# Altium PCB Space_Test_Battery.PcbDoc
Units mil, origin at the board's own origin, x right, y up, seen from the top; angles counter-clockwise.
Board outline 3932.01 x 2357.2 mil, 2 copper layers (Top Layer, Bottom Layer); 59 components, 50 nets, 196 pads, 26 vias.
Unrouted connection lines stored in the file: 5.
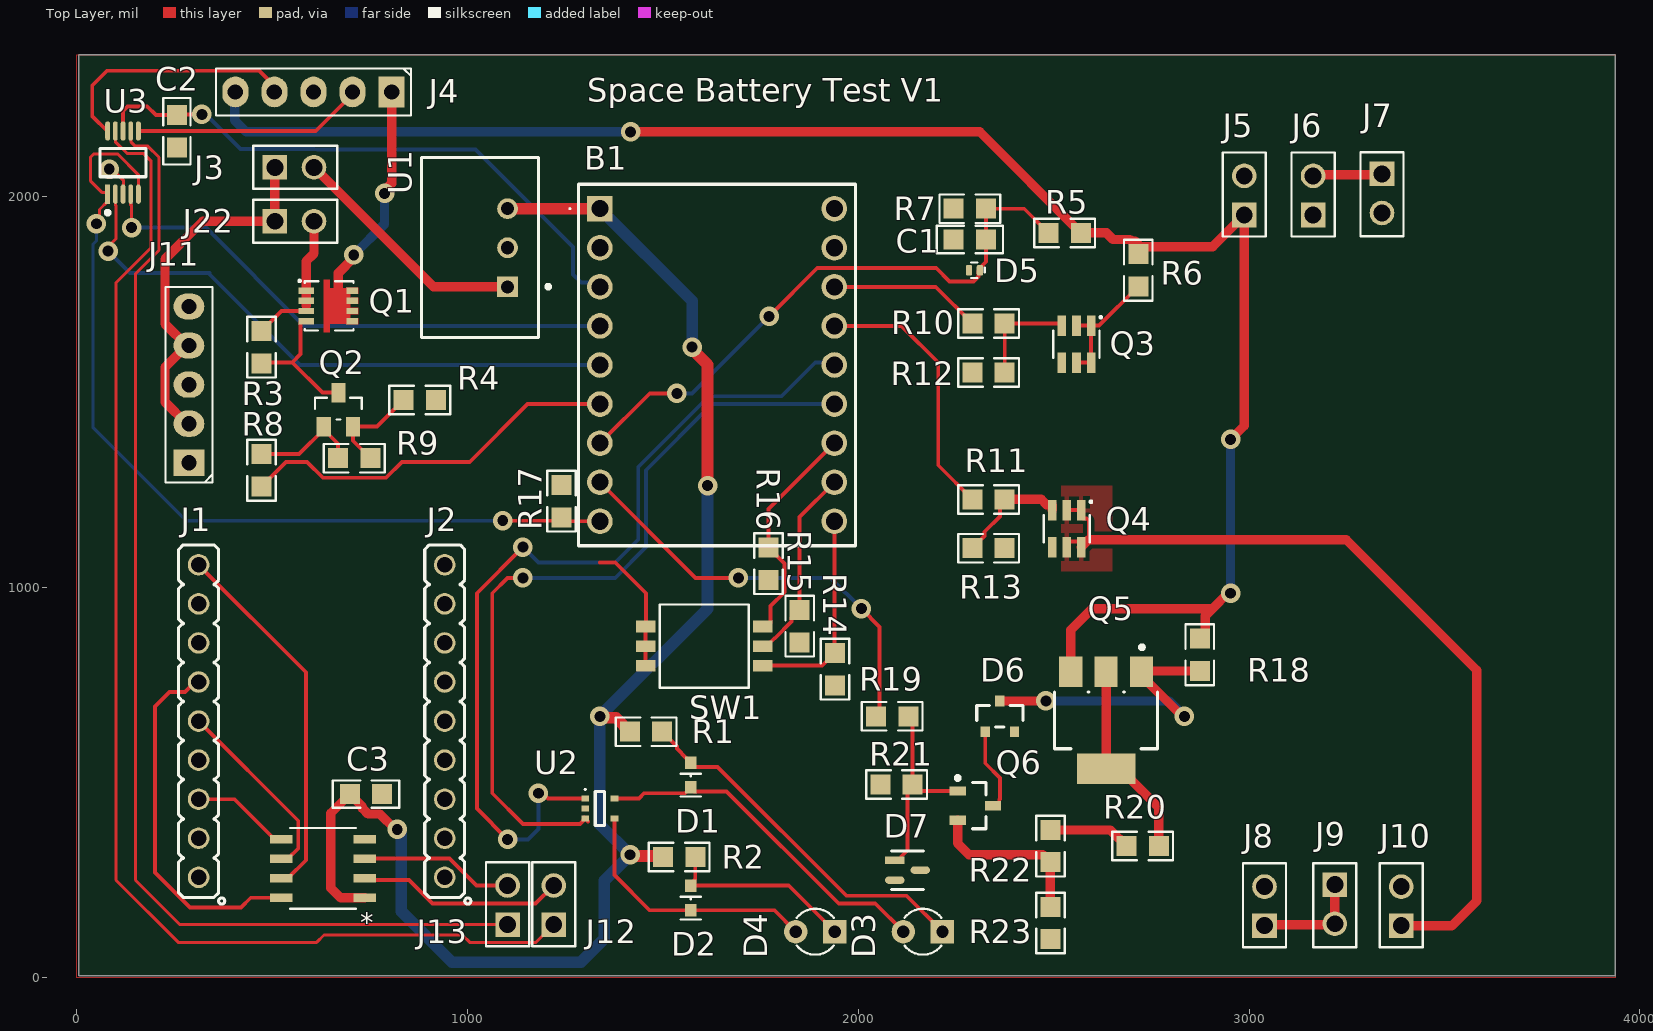
[diagram p0: Top Layer view]
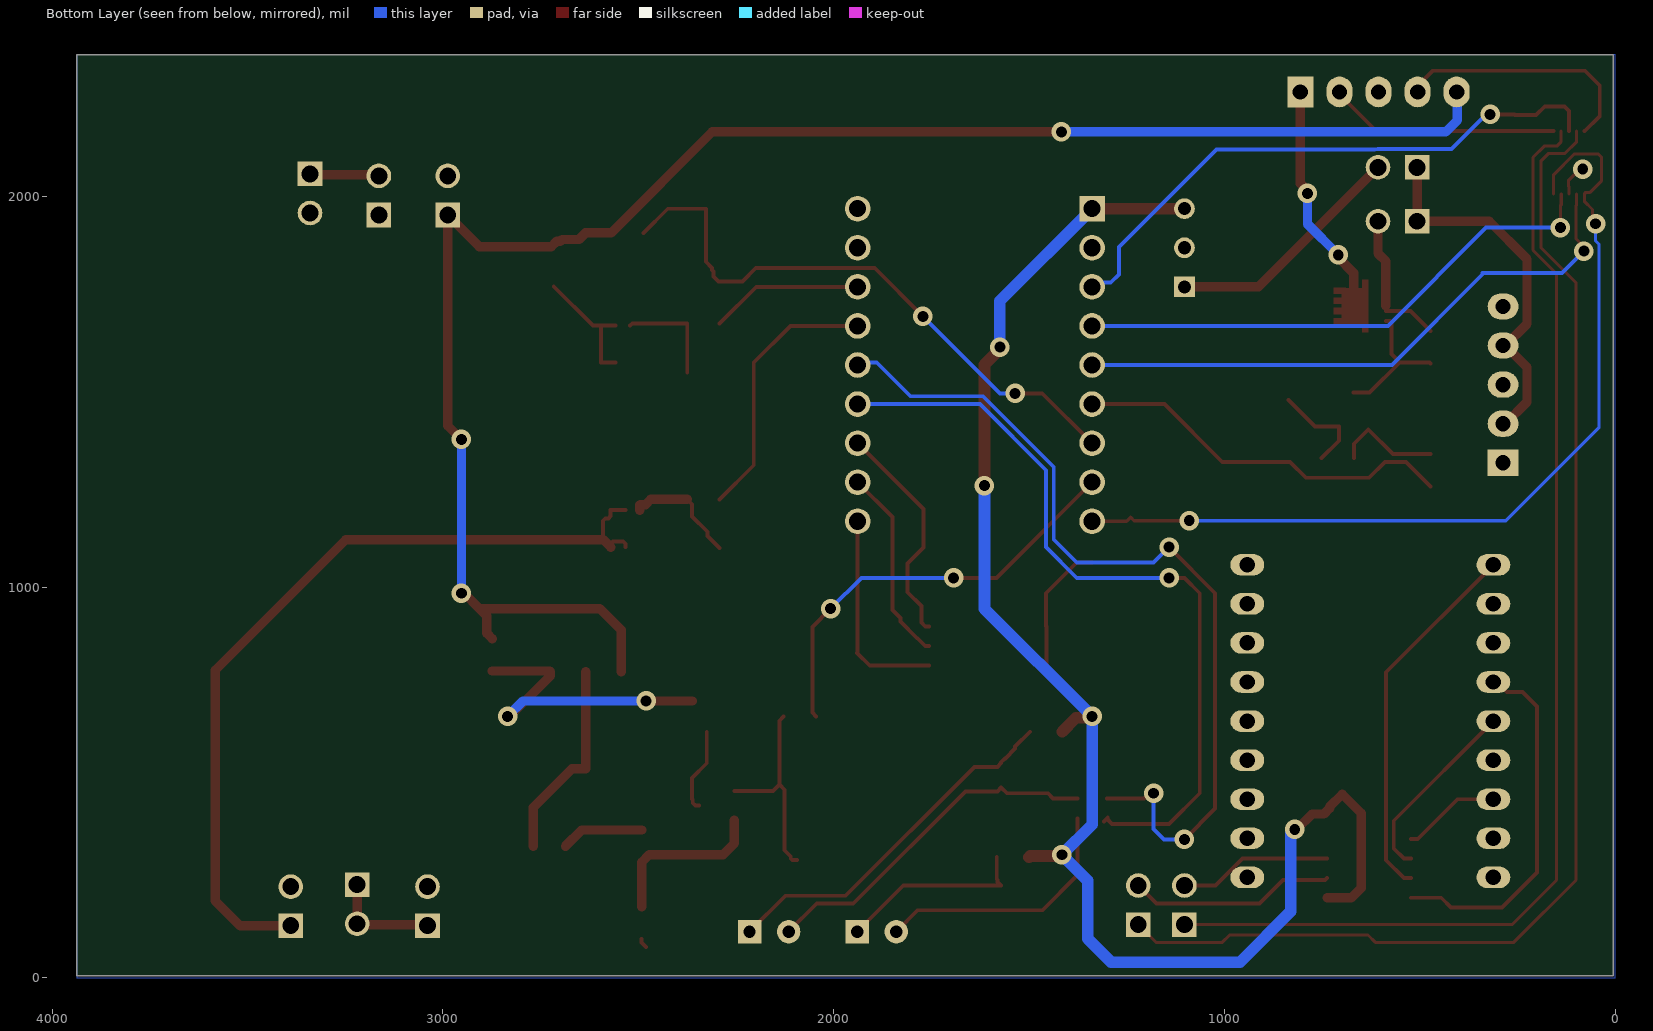
[diagram p1: Bottom Layer view, seen from below]

## Layer stack, top to bottom
Top Solder: solder mask 0.4, Solder Resist, Dk 3.5
Top Layer: signal copper 1.4
Dielectric 1: dielectric 12.6, FR-4, Dk 4.8
Bottom Layer: signal copper 1.4
Bottom Solder: solder mask 0.4, Solder Resist, Dk 3.5

## Board outline
5,5 5,2362.2 3937.01,2362.2 3937.01,5

## Design rules (kind name [scope] priority, off if disabled: settings)
Clearance Clearance_1 [OnMid vs OnMid] p1: gap=10 ignorepadtopadclearanceinfootprint=FALSE sourcerule=39 cellrowname=All cellrowtype=0 cellcolname=All cellcoltype=0 innerlayers=TRUE
Clearance Clearance_2 [(ExistsOnLayer('Top Layer') Or ExistsOnLayer('Bottom Layer')) vs (ExistsOnLayer('Top Layer') Or ExistsOnLayer('Bottom Layer'))] p2: gap=10 ignorepadtopadclearanceinfootprint=FALSE sourcerule=39 cellrowname=All cellrowtype=0 cellcolname=All cellcoltype=0 outerlayers=TRUE
Clearance [All] p3: gap=10 ignorepadtopadclearanceinfootprint=FALSE ismatrix=TRUE
PolygonConnect [All] p1: connectstyle=Relief reliefconductorwidth=10 reliefentries=4 polygonreliefangle="90 Angle" airgapwidth=10
RoutingVias [All] p1: holewidth=28 width=50 viastyle="Through Hole" minholewidth=28 minwidth=50 maxholewidth=28 maxwidth=50
SolderMaskExpansion [All] p1: expansion=4 istentingtop=FALSE
Width "Schematic Width Constraint_1" [InNetClass('switch')] p1: maxlimit=20 minlimit=10 preferedwidth=12 minimp=50.000000 maximp=50.000000 favimp=50.000000
Width "Schematic Width Constraint" [InNetClass('Power_thy')] p2: maxlimit=30 minlimit=10 preferedwidth=24 minimp=50.000000 maximp=50.000000 favimp=50.000000
Width MaxMinWidth_1 [InNetClass('UART')] p3: maxlimit=12 minlimit=8 preferedwidth=8 minimp=50.000000 maximp=50.000000 favimp=50.000000
Width [All] p4: maxlimit=10 minlimit=10 preferedwidth=10
30 further rules are at their usual default settings.

## Classes and differential pairs
net class UART: NetB1_4 NetB1_5 NetB1_9 NetJ4_1 NetJ4_4 NetJ12_1 NetJ13_1
component class UART-USB: C3 J1 J2 J12 J13
net class switch: NetB1_3 NetB1_10 NetB1_11 NetB1_12
net class Power_thy: +5 +12 "+Batter Input" NetD6_3 NetJ4_2 NetJ6_1 NetQ5_2 NetQ6_2 NetR20_1
component class Current_Sink: D6 D7 Q5 Q6 R18 R19 R20 R21 R22 R23
component class ESP32: B1 C1 C2 D1 D2 D3 D4 D5 J3 J5 J6 J7 J8 J9 J10 J11 J22 Q1 Q2 Q3 Q4 R1 R2 R3 R4 R5 R6 R7 R8 R9 R10 R11 R13 R14 R15 R16 R17 R18 SW1 U1 U2

## Components (designator, comment, footprint, x,y, rotation, side; value= is the part's Value field where it differs from the comment)
B1 "ESP32-C6-Zero" ESP32C6Zero 1338.58,1968.5 r0 top
C1 "3.9nF" CAP0805H1520 2285.43,1889.76 r0 top
C2 "3.9nF" CAP0805H1520 255.83,2166.67 r90 top
C3 "3.9nF" CAP0805H1520 740,470 r180 top
D1 "150060VS55040" LEDC160X75X41L40-green(WE) 1571.35,519.32 r90 top
D2 "150060VS55040" LEDC160X75X41L40-green(WE) 1571.35,204.36 r90 top
D3 "LED 3mm red" LED_THT_3mm 2165.35,118.11 r90 top
D4 "LED 3mm red" LED_THT_3mm 1889.76,118.11 r90 top
D5 "CPDV3V3A-HF" SOD882 2297.24,1811.02 r180 top
D6 "BZX84-C2.7-215" FP-SOT23-MFG 2362.2,669.29 r90 top
D7 "BAV99W,135" FP-SOT323-IPC_B 2125.98,275.59 r0 top
J1 "HDR_M_1X9" HDR_M_1X9 311.51,657.12 r90 top value=HDRM9
J2 "HDR_M_1X9" HDR_M_1X9 941.43,657.12 r90 top value=HDRM9
J3 "5-825433-0_2/50" PIN_HEADER_2_54mm_1_1mm_1x2 506.79,2074.44 r0 top
J4 "Header 1x5" "Header 1x5 2.54mm" 805.52,2267.35 r180 top
J5 "5-825433-0_2/50" PIN_HEADER_2_54mm_1_1mm_1x2 2987.89,1952.39 r90 top
J6 "5-825433-0_2/50" PIN_HEADER_2_54mm_1_1mm_1x2 3164.09,1952.39 r90 top
J7 "5-825433-0_2/50" PIN_HEADER_2_54mm_1_1mm_1x2 3340.25,2057.57 r270 top
J8 "5-825433-0_2/50" PIN_HEADER_2_54mm_1_1mm_1x2 3039.62,133.42 r90 top
J9 "5-825433-0_2/50" PIN_HEADER_2_54mm_1_1mm_1x2 3219.62,238.42 r270 top
J10 "5-825433-0_2/50" PIN_HEADER_2_54mm_1_1mm_1x2 3389.62,133.42 r90 top
J11 "Header 1x5" "Header 1x5 2.54mm" 286.83,1318.26 r90 top
J12 "5-825433-0_2/50" PIN_HEADER_2_54mm_1_1mm_1x2 1220.47,136.22 r90 top
J13 "5-825433-0_2/50" PIN_HEADER_2_54mm_1_1mm_1x2 1102.36,136.22 r90 top
J22 "5-825433-0_2/50" PIN_HEADER_2_54mm_1_1mm_1x2 506.79,1936.44 r0 top
Q1 "SI7617DN-T1-GE3" PowerPAK1212-8 645.86,1719.71 r0 top
Q2 "2N7002LT3G" SOT23 669.29,1456.69 r90 top
Q3 "IRLMS2002" SOT23-6 2558.36,1621.88 r270 top
Q4 "IRLMS2002" SOT23-6 2533.36,1149.64 r270 top
Q5 "BCP51" FP-318H-MFG 2634.35,659.2 r270 top
Q6 "BCX70G" INF-SOT23_N 2299.7,440.58 r0 top
R1 "2k2" RES0805MD 1456.69,629.92 r180 top
R2 "2k2" RES0805MD 1541.44,308.95 r180 top
R3 "36k" RES0805MD 472.44,1614.17 r90 top value=2k2
R4 "10k" RES0805MD 877.38,1478.89 r180 top value=2k2
R5 "20k" RES0805MD 2528.05,1906.53 r0 top value=2k2
R6 "2k2" RES0805MD 2716.54,1811.02 r270 top
R7 "10k" RES0805MD 2285.43,1968.5 r0 top value=2k2
R8 "100" RES0805MD 472.44,1299.21 r90 top value=2k2
R9 "10k" RES0805MD 710,1330 r180 top value=2k2
R10 "220" RES0805MD 2333.36,1674.64 r0 top value=2k2
R11 "220" RES0805MD 2333.36,1224.64 r0 top value=2k2
R12 "10k" RES0805MD 2333.36,1549.64 r0 top value=2k2
R13 "10k" RES0805MD 2333.36,1099.64 r180 top value=2k2
R14 "10k" RES0805MD 1940,790 r270 top value=2k2
R15 "10k" RES0805MD 1850,900 r270 top value=2k2
R16 "10k" RES0805MD 1770,1060 r270 top value=2k2
R17 "10k" RES0805MD 1240,1220 r90 top value=2k2
R18 "1k" RES0805MD 2874.02,826.77 r90 top value=2k2
R19 "1k" RES0805MD 2086.61,669.29 r180 top value=2k2
R20 "5.6E" RES0805MD 2727.77,337.16 r0 top value=2k2
R21 "47k" RES0805MD 2097.85,494.64 r0 top value=2k2
R22 "5.6E" RES0805MD 2491.55,337.16 r90 top value=2k2
R23 "5.6E" RES0805MD 2491.55,140.3 r90 top value=2k2
SW1 "WE_416131160803" WE_416131160803 1605.72,848.97 r270 top
U1 "TSR 1-2450" TRACO-SIP-3_V 1102.36,1868.5 r90 top
U2 "NSB1706DMW5T1G" ONSC-SC70-5-419A-02_V 1338.58,433.07 r0 top
U3 "TS5A23157DGSR" FP-DGS0010A-IPC_C 118.11,2086.61 r90 top
U4 "ISO6721BDR" SOIC_1BDR_TEX 630,280 r180 top

## Footprints (in the part's own frame and the unit in brackets; to place one, negate y for a bottom-side part, rotate by r counter-clockwise, add the part's x,y. Pads: shape width x height; smd on the part's side, far side on the other; paste and mask are expansions set on the pad)
CAP0805H1520 [mm] "Chip Capacitor 0805, 2-Leads, Body 2,00x1,25mm, IPC Medium Density"
  rect 1.3x1.3 smd: 1(-1.05,0) 2(1.05,0)
  silkscreen extent -2.16,-0.89 2.16,0.89, body extent -1.05,-0.67 1.05,0.68, height 1.52
ESP32C6Zero [mm]
  rect 1.665x1.665 hole 1.11: 1(0,0)
  round 1.665 hole 1.11: 2(0,-2.54) 3(0,-5.08) 4(0,-7.62) 5(0,-10.16) 6(0,-12.7) 7(0,-15.24) 8(0,-17.78) 9(0,-20.32) 10(15.24,-20.32) 11(15.24,-17.78) 12(15.24,-15.24) 13(15.24,-12.7) 14(15.24,-10.16) 15(15.24,-7.62) 16(15.24,-5.08) 17(15.24,-2.54) 18(15.24,0)
  silkscreen extent -2,-21.91 16.62,1.59
FP-318H-MFG [mm]
  rect 2x1.5 smd paste+0 mask+0: 1(-3.15,2.3) 2(-3.15,0) 3(-3.15,-2.3)
  rect 2x3.8 smd paste+0 mask+0: 4(3.15,0)
  silkscreen extent -4.87,-3.35 1.85,3.35, body extent -4.25,-3.68 4.25,3.68, height 0.25
FP-DGS0010A-IPC_C [mm]
  rect 1.257x0.312 smd paste+0 mask+0: 1(-2.051,1)
  rrect100% 1.257x0.312 smd paste+0 mask+0: 2(-2.051,0.5) 3(-2.051,0) 4(-2.051,-0.5) 5(-2.051,-1) 6(2.051,-1) 7(2.051,-0.5) 8(2.051,0) 9(2.051,0.5) 10(2.051,1)
  silkscreen extent -3.38,-1.5 0.92,1.5
FP-SOT23-MFG [mm]
  rect 0.7x0.6 smd paste-1000 mask+0: 1(-1,0.95) 2(-1,-0.95) 3(1,0)
  silkscreen extent -0.7,-1.5 0.7,1.5, body extent -1.5,-1.65 1.5,1.65, height 0.25
FP-SOT323-IPC_B [mm]
  rect 1.259x0.482 smd paste+0 mask+0: 1(-0.827,0.65)
  rrect100% 1.259x0.482 smd paste+0 mask+0: 2(-0.827,-0.65) 3(0.827,0)
  silkscreen extent -1.05,-1.25 1.05,1.25
HDR_M_1X9 [mm] "Connector; Header; 9 Position"
  round 1.4 / inner round 1.4 / far side oval 1.4x2.2 hole 1 mask+0.1: 1(-10.16,0) 2(-7.62,0) 3(-5.08,0) 4(-2.54,0) 5(0,0) 6(2.54,0) 7(5.08,0) 8(7.62,0) 9(10.16,0)
  silkscreen extent -11.9,-1.7 11.46,1.3, body extent -11.43,-1.3 11.43,1.19, height 8.54
"Header 1x5 2.54mm" [mm]
  rect 1.7x2 hole 1: 1(0,0)
  oval 1.7x2 hole 1: 2(2.54,0) 3(5.08,0) 4(7.62,0) 5(10.16,0)
  silkscreen extent -1.27,-1.52 11.43,1.52, body extent -1.27,-1.27 11.43,1.27, height 8.54
INF-SOT23_N [mm] "SOT23, 3-Leads, Body 2.9x1.3 mm, Pitch 0.95 mm, IPC Medium Density"
  rect 1.05x0.6 smd: 1(-1.15,0.95) 2(-1.15,-0.95) 3(1.15,0)
  silkscreen extent -1.27,-1.5 0.7,1.92, body extent -0.7,-1.5 0.7,1.5, height 1.1
LED_THT_3mm [mil] "THT LED 3mm, 2-Leads"
  rect 60x60 hole 31.5: 1(0,-50)
  round 60 hole 31.5: 2(0,50)
  silkscreen extent -59,-47 59,47, body extent -75,-75 75,63, height 256
LEDC160X75X41L40-green(WE) [mm] "Osram"
  rect 0.8x0.75 smd: 1(-0.8,0) 2(0.8,0)
  silkscreen extent -1.4,-0.65 0.08,0.65, body extent -0.8,-0.4 0.8,0.4, height 0.4
ONSC-SC70-5-419A-02_V [mm] "SOT23, 5-Leads, Body 2x1.25mm, Pitch 0.65mm"
  rect 0.5x0.4 smd: 1(-0.95,0.65) 2(-0.95,0) 3(-0.95,-0.65) 4(0.95,-0.65) 5(0.95,0.65)
  silkscreen extent -1,-1.1 0.3,1.3, body extent -0.63,-1 0.63,1, height 1.1
PIN_HEADER_2_54mm_1_1mm_1x2 [mm] "Stiftleiste 1x2 THT Pitch 2.54mm"
  rect 1.6x1.6 hole 1.1: 1(0,0)
  round 1.6 hole 1.1: 2(2.54,0)
  silkscreen extent -1.4,-1.4 4.06,1.4, body extent -1.22,-1.26 3.86,1.28, height 8.54
PowerPAK1212-8 [mm] "SOIC, 8-Leads, Body 4,90x3,90mm, Pitch 1,27mm, IPC Medium Density"
  rect 0.99x0.405 smd paste-0.05: 1(-1.492,0.99) 2(-1.492,0.33) 3(-1.492,-0.33) 4(-1.492,-0.99)
  rect 0.76x0.405 smd paste-0.05: 5(1.493,-0.99) 6(1.493,-0.33) 7(1.493,0.33) 8(1.493,0.99)
  Top Layer region: 1.873,1.194 1.873,1.194 1.112,1.194 1.112,1.152 0.038,1.152 0.038,1.702 -0.362,1.702 -0.362,-1.698 0.038,-1.698 0.038,-1.148 1.112,-1.148 1.112,-1.191 1.873,-1.191 1.872,-0.786 1.873,-0.786 1.363,-0.786 1.363,-0.531 1.363,-0.531 1.872,-0.531 1.872,-0.126 1.855,-0.126 1.363,-0.126 1.363,0.129 1.872,0.129 1.872,0.534 1.363,0.534 1.363,0.789 1.873,0.789 1.873,1.194
  silkscreen extent -1.93,-1.6 1.57,1.63, body extent -1.57,-1.57 1.57,1.57, height 1.17
RES0805MD [mm]
  rect 1.3x1.3 smd: 1(-1.05,0) 2(1.05,0)
  silkscreen extent -1.98,-0.93 1.98,0.93, body extent -1,-0.7 1,0.7, height 0.5
SOD882 [mm] "SON, 2-Leads, Body 0,59x0,99mm, Pitch 0,65mm, IPC Medium Density"
  rrect50% 0.4x0.7 smd paste-0.05 mask+0.05: 1(-0.35,0) 2(0.35,0)
  silkscreen extent -0.67,-0.5 0.2,0.5, body extent -0.51,-0.31 0.51,0.31, height 0.5
SOIC_1BDR_TEX [mil]
  rect 57.28x21.97 smd paste+0 mask+0: 1(-107.14,75) 2(-107.14,25) 3(-107.14,-25) 4(-107.14,-75) 5(107.14,-75) 6(107.14,-25) 7(107.14,25) 8(107.14,75)
  silkscreen extent -84,-104 84,104, body extent -122,-99 122,99, height 69
SOT23 [mil] "SOT23, 3-Leads, Body 2,92x2,37mm, Pitch 0,95mm, IPC Medium Density"
  rect 50x36 smd paste-18 mask+1.97: 1(-46,37.5) 2(-46,-37.5) 3(41,0)
  silkscreen extent -28,-60 28,60, body extent -48,-55 48,55, height 43
SOT23-6 [mm] "SOT23, 6-Leads, Body 2,90x2,80mm, Pitch 0,95mm, IPC Medium Density"
  rect 1.33x0.56 smd paste-0.28 mask+0.05: 1(-1.2,0.95) 2(-1.2,0) 3(-1.2,-0.95) 4(1.2,-0.95) 5(1.2,0) 6(1.2,0.95)
  silkscreen extent -1.82,-1.5 0.87,1.65, body extent -1.4,-1.45 1.4,1.45, height 1.45
TRACO-SIP-3_V [mm] "SIP, 3-Leads, Body 11.7x7.6mm, Pitch 2.54mm"
  rect 1.35x1.35 hole 0.85 paste-2539.97: 1(-2.54,0)
  round 1.35 hole 0.85 paste-2539.97: 2(0,0) 3(2.54,0)
  silkscreen extent -5.84,-2.77 5.86,5.6, body extent -5.84,-2 5.86,5.6, height 10.2
WE_416131160803 [mm] "DIP Switch tripple, Wuerth 416131160803"
  rect 0.76x1.27 smd: 1(-1.27,-3.81) 2(-1.27,3.81) 3(0,-3.81) 4(0,3.81) 5(1.27,-3.81) 6(1.27,3.81)
  silkscreen extent -2.7,-2.9 2.7,2.9, body extent -2.42,-4 2.42,4, height 2.11

## Part data
B1: "ESP32-C6 Mini Development Board, Based on ESP32-C6FH4, Dual Processors, 160MHz Running Frequency, 2.4GHz WiFi 6 & Bluetooth 5, ESP32 Development Board", Manufacturer_Name=Waveshare, Datasheet Link=https://www.waveshare.com/esp32-c6-zero.htm, Geometry.Height=5.5mm, Manufacturer_Part_Number=ESP32-C6-Zero
C1 C2 C3: library part UID-1DC189D77836E3ADB330, "CAP 3.9nF 5% C0G 50V", Manufacturer="KYOCERA AVX", Manufacturer Part Number=08055A392JAT2A, Package / Case=0805, SAP-Partnumber=35031280, Temperature - Rated="-55 °C to +125 °C", Tolerance=5%, Voltage - Rated=50V, Category=Ceramic, Compliance=RoHS2, ComponentLink1Description=Datasheet, ComponentLink1URL=https://code.bbraun.io/BA-RD-EE/altium-partlib/raw/main/components/datasheets/35031280_SMD_KOND-KER_3,9NF_5Proz_50V_C0G_0805/AVX_datasheet_C0GNP0-Dielectric.pdf, ComponentLink2Description="Compliance Certificate", ComponentLink2URL=https://code.bbraun.io/BA-RD-EE/altium-partlib/raw/main/components/datasheets/35031280_SMD_KOND-KER_3,9NF_5Proz_50V_C0G_0805/AVX_datasheet_C0GNP0-Dielectric.pdf, ComponentLink3Description="Datasheet Folder", ComponentLink3URL=https://code.bbraun.io/BA-RD-EE/altium-partlib/raw/main/components/datasheets/35031280_SMD_KOND-KER_3,9NF_5Proz_50V_C0G_0805/, ComponentLink4Description="Data Sheet Library", ComponentLink4URL=http://ais.development.bbraun.com/dsl/35031280, Creation Date=22.05.2023, Creator=weirmade, Last Updated=22.05.2023, Library Status=Production, Lifecycle Status=Active, Maximum Height="1.52 mm", partid=60, Price@1k="0,01183 €", Review Date=07.06.2025, Reviewer=hoersede, Supplier 1=Mouser, Supplier 2=Digikey, Supplier 3="RS Components", Supplier 4=Farnell, Technology=SMT, Type=C0G, uid=UID-1DC189D77836E3ADB330
D1 D2: library part UID-108CCBCADD5F52F6FAD1, "Led Green 0603 SMD", Current Rated=20mA, Manufacturer="Würth Elektronik", Package / Case=0603, SAP-Partnumber=35146000, Supplier Part Number 1=710-150060VS55040, Temperature - Rated="-40 °C to +85 °C", Voltage - Rated=2.4V, Category=LED, Compliance=RoHS, ComponentLink1Description=Datasheet, ComponentLink1URL=https://code.bbraun.io/BA-RD-EE/altium-partlib/raw/main/components/datasheets/35146000_SMD_LED-Green_0603/35146000_Wuerth_150060VS55040_Datasheet.pdf, ComponentLink2Description="Compliance Certificate", ComponentLink2URL=https://code.bbraun.io/BA-RD-EE/altium-partlib/raw/main/components/datasheets/35146000_SMD_LED-Green_0603/35146000_Wuerth_150060VS55040_ROHS_REACH.pdf, ComponentLink3Description="Datasheet Folder", ComponentLink3URL=https://code.bbraun.io/BA-RD-EE/altium-partlib/raw/main/components/datasheets/35146000_SMD_LED-Green_0603/, ComponentLink4Description="Data Sheet Library", ComponentLink4URL=http://ais.development.bbraun.com/dsl/35146000, Creation Date=21.05.2022, Creator="GEG DF,GK", Last Updated=15.01.2026, Library Status=Prototype, Lifecycle Status=Active, Manufacturer Part Number=150060VS55040, Maximum Height="0.5 mm", partid=61, Price@1k="0,033 €", Remark=NGX, Review Date=08.06.2025, Reviewer=hoersede, Supplier 1=Mouser, Supplier 2=Digikey, Supplier 3="RS Components", Supplier 4=Farnell, Supplier Part Number 2=732-12017-2-ND, Supplier Part Number 3=1766157, Supplier Part Number 4=2900765RL, Technology=SMT, uid=UID-108CCBCADD5F52F6FAD1
D3 D4: library part UID-E12BBC48C07D2EA352E9, "LED Red, 625 nm, GaAsP/GaP, THT, 3mm", BBPUC-Partnumber=-, Current Rated="20 mA", Manufacturer=TruComponents, Manufacturer Part Number=TC-9510472, Package / Case=3mm, Supplier Part Number 1="2377618 - 62", Temperature - Rated="-40 °C to + 85 °C", Voltage - Rated=5V, Category=LED, ComponentLink1Description=Datasheet, ComponentLink1URL=https://code.bbraun.io/BA-RD-EE/altium-partlib/raw/main/components/datasheets/UID-E12BBC48C07D2EA352E9_LED_3mm_Red_THT/3mm_LED_Datasheet.pdf, ComponentLink2Description="Compliance Certificate", ComponentLink3Description="Datasheet Folder", ComponentLink3URL=https://code.bbraun.io/BA-RD-EE/altium-partlib/raw/main/components/datasheets/UID-E12BBC48C07D2EA352E9_LED_3mm_Red_THT/, ComponentLink4Description="Data Sheet Library", Creation Date=22.04.2026, Creator=palmfrde, Library Status=New, Lifecycle Status=Active, Maximum Height="6.3 mm", partid=106, Price@1k="0,18 €", Remark=EPG, Supplier 1=Conrad, Supplier 2=Digikey, Supplier 3="RS Components", Supplier 4=Farnell, Technology=THT, uid=UID-E12BBC48C07D2EA352E9
D5: library part UID-3D03554C99A7E31313F8, "Unidirectional ESD protection diode", BBPUC-Partnumber=2838.332, Current Rated=15A, Manufacturer=Nexperia, Manufacturer Part Number=PESD3V3S1UL, Package / Case=SOD882, SAP-Partnumber=35140169, Temperature - Rated="-55 °C to +150 °C", Voltage - Rated=3.3V, Category="ESD Diode", Compliance=RoHS2, ComponentLink1Description=Datasheet, ComponentLink1URL=https://code.bbraun.io/BA-RD-EE/altium-partlib/raw/main/components/datasheets/35140169_SMD_Diode_ESD_PESD3V3S1UL_SOD882/PESD3V3S1UL.pdf, ComponentLink2Description="Compliance Certificate", ComponentLink2URL=https://code.bbraun.io/BA-RD-EE/altium-partlib/raw/main/components/datasheets/35140169_SMD_Diode_ESD_PESD3V3S1UL_SOD882/Nexperia_-_Statement_on_RoHS_082019.pdf, ComponentLink3Description="Datasheet Folder", ComponentLink3URL=https://code.bbraun.io/BA-RD-EE/altium-partlib/raw/main/components/datasheets/35140169_SMD_Diode_ESD_PESD3V3S1UL_SOD882/, ComponentLink4Description="Data Sheet Library", ComponentLink4URL=http://ais.development.bbraun.com/dsl/35140169, Creation Date=16.05.2023, Creator=hoersede, Last Updated=22.06.2023, Library Status=Prototype, Lifecycle Status=Active, Maximum Height="0.5 mm", partid=43, Price@1k="0,0247 €", Review Date=08.06.2025, Reviewer=hoersede, Supplier 1=Mouser, Supplier 2=Digikey, Supplier 3="RS Components", Supplier 4=Farnell, uid=UID-3D03554C99A7E31313F8
D6: library part CMP-14400-000001-1, "DIODE ZENER 2,7V 250MW SOT23", Ambient Temperature Range High=+150°C, Forward Current=200mA, Manufacturer=Nexperia, Manufacturer Part Number=BZX84-C20,215, Max Reverse Leakage Current=0.05uA, Max Zener Voltage=21.2V, Nom Zener Voltage=20V, Package=SOT23, Power Dissipation=250mW, Reverse Voltage=14V, Temperature="-65°C to +150°C", Temperature Range Low=-65°C, Automotive=Yes, Automotive Grade="Grade 0", Category=Diode, ComponentLink2Description=Datasheet, ComponentLink2URL=https://assets.nexperia.com/documents/data-sheet/BZX84_SER.pdf, Device Class L1="Discrete Semiconductors", Device Class L2=Diodes, Device Class L3="Zener Diodes", Digikey Description="DIODE ZENER 20V 250MW SOT23", Footprint Url=https://assets.nexperia.com/documents/outline-drawing/SOT23.pdf, Height=1.1mm, Ipc Land Pattern Name=SOT95P230X100-3, Lead Free=Yes, Max Junction Temp=+150°C, Mouser Description="Diode Zener Single 20V 5% 250mW Automotive 3-Pin SOT-23 T/R", Octopart=https://octopart.com/bzx84-c20%2C215-nexperia-78740231, RoHS=TRUE, Temperature Range High=+150°C, Zener Impedance=15Ω
D7: library part CMP-14399-000011-1, "DIODE ARRAY GP 100V 150MA SOT323"
J1 J2: library part CMP-002-00798-1, Component Type=Standard, Design Item ID=HDR_M_1X9, Pins=9, Source="Conn Header.SchLib"
J3 J5 J6 J7 J8 J9 J10 J12 J13 J22: library part UID-C948C1FBE4D127CA7C47, "THT Pin Header, 1x2, 2.54mm, stehend", Current Rated=5A, Manufacturer="TE Connectivity", Manufacturer Part Number=5-825433-0, SAP-Partnumber=33193339, Temperature - Rated="-65 °C to + 105 °C", Voltage - Rated=750Vrms, Category="Pin Header", Compliance=RoHS2, ComponentLink1Description=Datasheet, ComponentLink1URL=https://code.bbraun.io/BA-RD-EE/altium-partlib/raw/main/components/datasheets/33193339_PIN_HEADER_2_54mm_1x50_TE/product-5-825433-0.datasheet.pdf, ComponentLink2Description="Compliance Certificate", ComponentLink2URL=https://code.bbraun.io/BA-RD-EE/altium-partlib/raw/main/components/datasheets/33193339_PIN_HEADER_2_54mm_1x50_TE/product-5-825433-0.datasheet.pdf, ComponentLink3Description="Datasheet Folder", ComponentLink3URL=https://code.bbraun.io/BA-RD-EE/altium-partlib/raw/main/components/datasheets/33193339_PIN_HEADER_2_54mm_1x50_TE, ComponentLink4Description="Data Sheet Library", ComponentLink4URL=http://ais.development.bbraun.com/dsl/33193339, Contacts=2, Creation Date=09.02.2023, Creator=sifngu01, Last Updated=22.06.2023, Library Status=Prototype, Lifecycle Status=Active, Maximum Height="8.54 mm", partid=27, Price@1k="1,65 €", Review Date=12.06.2024, Reviewer=vaupmide, Supplier 1=Mouser, Supplier 2=Digikey, Supplier 3="RS Components", Supplier 4=Farnell, uid=UID-C948C1FBE4D127CA7C47
J4 J11: library part CMP-002-00275-1, "Header 1x5 2.54mm", Design Item ID="Header 1x5", Source=Header.SchLib
Q1: library part UID-FE97C754B092DB379145, "FET P-CH", Current - Rated="35 A", Manufacturer=Vishay, Package / Case=PowerPAK1212-8, SAP-Partnumber=35140024, Supplier Part Number 1=781-SI7617DN-GE3, Temperature - Rated="-55 °C to +150 °C", Voltage - Rated=30V, Category="FET p-Ch", Compliance=RoHS3, ComponentLink1Description=Datasheet, ComponentLink1URL=https://code.bbraun.io/BA-RD-EE/altium-partlib/raw/main/components/datasheets/35140024_SMD_Transistor_P-Channel_Si7617DN/Datasheet_SI7617DN.pdf, ComponentLink2Description="Compliance Certificate", ComponentLink2URL=https://code.bbraun.io/BA-RD-EE/altium-partlib/raw/main/components/datasheets/35140024_SMD_Transistor_P-Channel_Si7617DN/Compliance/VISH-E-A0015053004-1.pdf, ComponentLink3Description="Datasheet Folder", ComponentLink3URL=https://code.bbraun.io/BA-RD-EE/altium-partlib/raw/main/components/datasheets/35140024_SMD_Transistor_P-Channel_Si7617DN/, ComponentLink4Description="Data Sheet Library", ComponentLink4URL=http://ais.development.bbraun.com/dsl/35140024, Creation Date=04.08.2023, Creator=mochalde, Last Updated=28.11.2023, Library Status=Prototype, Lifecycle Status=Active, Manufacturer Part Number=SI7617DN-T1-GE3, Maximum Height="1.17 mm", partid=22, Price@1k="0,2450 €", RDS-on=0.0123R, Review Date=08.07.2024, Reviewer=vaupmide, Supplier 1=Mouser, Supplier 2=Digikey, Supplier 3="RS Components", Supplier 4=Farnell, Supplier Part Number 2=SI7617DN-T1-GE3TR-ND, Technology=SMT, uid=UID-FE97C754B092DB379145
Q2: library part UID-746324AF67844B7863CB, "N-Channel MOSFET 60V 115m, SMD SOT23-3", Current - Rated="115 mA", Manufacturer=onsemi, Package / Case=SOT-23, SAP-Partnumber=35140038, Supplier Part Number 1=863-2N7002LT3G, Temperature - Rated="-55 °C to +150 °C", Voltage - Rated=60V, Category="FET n-Ch", Compliance=RoHS, ComponentLink1Description=Datasheet, ComponentLink1URL=https://code.bbraun.io/BA-RD-EE/altium-partlib/raw/main/components/datasheets/35140038_SMD_MOSFET-N-Chanel_2N7002L_SOT23/Onsemi_2N7002LT3G.PDF, ComponentLink2Description="Compliance Certificate", ComponentLink2URL=https://code.bbraun.io/BA-RD-EE/altium-partlib/raw/main/components/datasheets/35140038_SMD_MOSFET-N-Chanel_2N7002L_SOT23/Compliance/RoHS-Compliance_2N7002LT3G.png, ComponentLink3Description="Datasheet Folder", ComponentLink3URL=https://code.bbraun.io/BA-RD-EE/altium-partlib/raw/main/components/datasheets/35140038_SMD_MOSFET-N-Chanel_2N7002L_SOT23/, ComponentLink4Description="Data Sheet Library", ComponentLink4URL=http://ais.development.bbraun.com/dsl/35140038, Creation Date=22.04.2022, Creator="GEG DF,GK", Last Updated=10.01.2024, Library Status=Prototype, Lifecycle Status=Active, Manufacturer Part Number=2N7002LT3G, Maximum Height="1.1 mm", partid=17, Price@1k="0,235 €", RDS-on=7R5, Remark=NGX, Review Date=08.07.2024, Reviewer=vaupmide, Supplier 1=Mouser, Supplier 2=Digikey, Supplier 3="RS Components", Supplier 4=Farnell, Supplier Part Number 2=2N7002LT3GOSTR-ND, Technology=SMT, uid=UID-746324AF67844B7863CB
Q3 Q4: library part UID-A18DAACDD2725A595700, "FET N-Ch", Current Rated=6.5A, Manufacturer=Infineon, Manufacturer Part Number=IRLMS2002TRPBF, Package / Case=SOT23, SAP-Partnumber=35140704, Temperature - Rated="-55 °C to +150 °C", Voltage - Rated=20V, Category="FET n-Ch", Compliance=RoHS2, ComponentLink1Description=Datasheet, ComponentLink1URL=https://code.bbraun.io/BA-RD-EE/altium-partlib/raw/main/components/datasheets/35140704_SMD_TRANSISTOR_N-KANAL_IRLMS2002_SOT-23/Infineon_datasheet_IRLMS2002-v01_01.pdf, ComponentLink2Description="Compliance Certificate", ComponentLink2URL=https://code.bbraun.io/BA-RD-EE/altium-partlib/raw/main/components/datasheets/35140704_SMD_TRANSISTOR_N-KANAL_IRLMS2002_SOT-23/Infineon_datasheet_IRLMS2002-v01_01.pdf, ComponentLink3Description="Datasheet Folder", ComponentLink3URL=https://code.bbraun.io/BA-RD-EE/altium-partlib/raw/main/components/datasheets/35140704_SMD_TRANSISTOR_N-KANAL_IRLMS2002_SOT-23/, ComponentLink4Description="Data Sheet Library", ComponentLink4URL=http://ais.development.bbraun.com/dsl/35140704, Creation Date=18.08.2022, Creator=weirmade, Library Status=Production, Lifecycle Status=Active, Maximum Height="1.45 mm", partid=7, Price@1k="0,0751 €", RDS-on=0.03R, Review Date=07.06.2025, Reviewer=hoersede, Supplier 1=Mouser, Supplier 2=Digikey, Supplier 3="RS Components", Supplier 4=Farnell, uid=UID-A18DAACDD2725A595700
Q5: library part CMP-00278-84324633-1, "BCP51 Trans Gp Bjt PNP 45V 1.5A 1000MW 4-PIN(3+TAB) SOT-223 T/r / Trans PNP 45V 1.5A SOT-223", Case/Package=SOT-223, Collector Base Voltage (VCBO)=-45V, Collector Emitter Saturation Voltage=-500mV, Emitter Base Voltage (VEBO)=-5V, Manufacturer Lifecycle Status=OBSOLETE, Max Collector Current=-1.5A, Max Junction Temperature (Tj)=150°C, Min Operating Temperature=-55°C, Power Dissipation=1W, Collector Emitter Breakdown Voltage=-45V, Collector Emitter Voltage (VCEO)=-45V, Height=1.8mm, hFE Min=40, Lead Free="Lead Free", Lifecycle Status=Obsolete, Max Operating Temperature=150°C, NexarPartId=84324633, Number of Elements=1, Number of Pins=3, Polarity=PNP, RoHS=Compliant, Schedule B="8541290080, 8541290080"
Q6: library part CMP-1177-00052-1, "NPN Silicon AF Transistor, 45 V VCEO, 100 mA IC, SOT23, Reel, Green", Manufacturer=Infineon, ComponentLink1Description="Manufacturer URL", ComponentLink1URL=http://www.infineon.com/, ComponentLink2Description=Datasheet, ComponentLink2URL=http://www.infineon.com/dgdl/bcw60_bcx70.pdf?folderId=db3a304314dca389011541d30fa21656&fileId=db3a304314dca38901154219c9141726, ComponentLink3Description="Package Specification", ComponentLink3URL=http://www.infineon.com/dgdl/SOT23-Package_Overview.pdf?folderId=db3a30431936bc4b0119532290053c66&fileId=db3a30431936bc4b0119533468123c85, F (typ)="2 dB", fT (typ)="250Â MHz", Green=TRUE, IBM (max)="200Â mA", IC (max)="100Â mA", ICBO (max)="20Â nA", ICM (max)="200Â mA", Mounting Technology="Surface Mount", PackageDescription="3-Pin Small Outline Transistor Package, 1.3 x 2.9 mm Body, 0.95 mm Pitch", PackageReference=SOT23, PackageVersion=Apr-08, Packing=Reel, PartNumber=BCX70G, Polarity=NPN, Ptot (max)="330Â mW", VCBO (max)="45Â V", VCEO (max)="45Â V", VEBO (max)="6Â V"
R1 R2 R3 R4 R5 R6 R7 R8 R9 R10 R11 R12 R13 R14 R15 R16 R17 R18 R19 R20 R21 R22 R23: library part UID-0F2DF2513351442B7CD8, "RES 2K2 1% 125mW 0805", Manufacturer=Yageo, Manufacturer Part Number=RC0805FR-132K2L, Package / Case=0805, Power - Rated=125mW, SAP-Partnumber=35110490, Supplier Part Number 1=603-RC0805FR-132K2L, Temperature - Rated="-55 °C to +155 °C", Temperature Coefficient=TC100, Tolerance=1%, Voltage - Rated=150V, Compliance=RoHS, ComponentLink1Description=Datasheet, ComponentLink1URL=https://code.bbraun.io/BA-RD-EE/altium-partlib/raw/main/components/datasheets/35110490_SMD_Widerstand_2K2_1Proz_0805/Yageo_RC0805FR-132K2L.pdf, ComponentLink2Description="Compliance Certificate", ComponentLink2URL=https://code.bbraun.io/BA-RD-EE/altium-partlib/raw/main/components/datasheets/35110490_SMD_Widerstand_2K2_1Proz_0805/Yageo_RC0805FR-132K2L.pdf, ComponentLink3Description="Datasheet Folder", ComponentLink3URL=https://code.bbraun.io/BA-RD-EE/altium-partlib/raw/main/components/datasheets/35110490_SMD_Widerstand_2K2_1Proz_0805/, ComponentLink4Description="Data Sheet Library", ComponentLink4URL=http://ais.development.bbraun.com/dsl/35110490, Creation Date=22.04.2022, Creator="GEG DF,GK", Last Updated=22.06.2023, Library Status=New, Lifecycle Status=Active, Maximum Height="0.6 mm", partid=156, Price@1k="0,0075 €", Remark=NGX, Review Date=10.03.2026, Reviewer=hoersede, Supplier 1=Mouser, Supplier 2=Digikey, Supplier 3="RS Components", Supplier 4=Farnell, Supplier Part Number 2=13-RC0805FR-132K2LTR-ND, Technology=SMT, Type="Thick Film", uid=UID-0F2DF2513351442B7CD8
SW1: library part UID-1051BDF3C131CE8C09EA, "SMD DIP-Switch tripple 1.27mm pitch", Manufacturer="Würth Elektronik", Manufacturer Part Number=416131160803, Supplier Part Number 1=710-416131160803, Temperature - Rated="-40 °C to +85 °C", Category="DIP Switch", Compliance=RoHS, ComponentLink1Description=Datasheet, ComponentLink1URL=https://code.bbraun.io/BA-RD-EE/altium-partlib/raw/main/components/datasheets/UID-1051BDF3C131CE8C09EA_DIP-Switch_Wuerth_416131160803/Wuerth_416131160803.pdf, ComponentLink2Description="Compliance Certificate", ComponentLink2URL=https://code.bbraun.io/BA-RD-EE/altium-partlib/raw/main/components/datasheets/UID-1051BDF3C131CE8C09EA_DIP-Switch_Wuerth_416131160803/Wuerth_416131160803.pdf, ComponentLink3Description="Datasheet Folder", ComponentLink3URL=https://code.bbraun.io/BA-RD-EE/altium-partlib/raw/main/components/datasheets/UID-1051BDF3C131CE8C09EA_DIP-Switch_Wuerth_416131160803/, ComponentLink4Description="Data Sheet Library", Creation Date=11.02.2025, Creator=ostemcde, Maximum Height="2.65 mm", partid=30, Price@1k="1,76 €", Supplier 1=Mouser, Supplier 2=Digikey, Supplier 3="RS Components", Supplier 4=Farnell, Supplier Part Number 2=732-416131160803TR-ND, Supplier Part Number 3=254-1753, Technology=SMT, uid=UID-1051BDF3C131CE8C09EA
U1: library part CMP-2000-05427-1, "DC/DC converter, 5 VDC, 1000 mA, -40 to 85 degC, 3-Pin SIP, RoHS", Input Voltage DC Max=36V, Input Voltage DC Min=6.5V, Manufacturer=Tracopower, Output Current Max=1A, Output Power Max=5W, Output Voltage Nom.=5V, Package Description="3-Pin Single In-line Package, Body 11.7 x 7.6 mm, Pitch 2.54 mm", Package Reference=SIP-3, Approvals & Standards=IEC,UL, Datasheet URL=https://datasheet.ciiva.com/6815/tsr1-6815641.pdf, Datasheet Version=Jan-15, DC / DC Converter Mounting=ThroughHole, DC / DC Converter Output Type=Fixed, DC / DC Converter Type=SIP, Depth=11.7mm, Height=10.2mm, Manufacturer URL=http://www.tracopower.com/home, No. of Outputs=1Output, Product Range=TSR-1Series, Width=7.6mm
U2: library part CMP-0630-00174-1, "Dual Bias Resistor Transistors, NPN Silicon Surface Mount Transistor, 5-Pin SC70, Pb-Free, Tape and Reel", Manufacturer="On Semiconductor", ComponentLink1Description="Manufacturer URL", ComponentLink1URL=http://www.onsemi.com/, ComponentLink2Description=Datasheet, ComponentLink2URL=http://www.onsemi.cn/pub_link/Collateral/NSB1706DMW5T1-D.PDF, ComponentLink3Description="Package Specification", ComponentLink3URL=http://www.onsemi.cn/pub_link/Collateral/419A-02.PDF, DatasheetVersion="Rev. 5", hFE Min=80, IC Continuous (A)=0.1, Mounting Technology="Surface Mount", PackageDescription="5-Pin Small Outline Transistor, Body 2 x 1.25 mm, Pitch 0.65 mm", PackageReference=SC70-5-419A-02, PackageVersion="Rev. L, 01/2013", Packing="Tape and Reel", PartNumber=NSB1706DMW5T1G, Polarity="Dual NPN", R1/R2 Typ=0.1, RoHS=TRUE, V(BR)CEO Min (V)=50
U3: library part CMP-04892-000058-1, "IC SWITCH DUAL SPDT 10MSOP", Case/Package=VSSOP, High Level Output Current=50mA, Max Operating Temperature=85°C, Max Supply Current=1uA, Max Supply Voltage=5.5V, Min Operating Temperature=-40°C, Min Supply Voltage=1.8V, On-State Resistance=10R, Package Quantity=1, Bandwidth=220MHz, Contact Plating=Gold, Height=1.02mm, Lead Free="Lead Free", Length=3mm, Low Level Output Current=50mA, Mount="Surface Mount", Number of Bits=2, Number of Channels=2, Number of Inputs=2, Number of Outputs=4, Number of Pins=10, Operating Supply Current=1uA, Packaging="Tape and Reel", Polarity=Non-Inverting, Radiation Hardening=No, Series=-, Supply Type=Single, Throw Configuration=SPDT, Turn-Off Delay Time=3.8ns, Turn-On Delay Time=5.7ns, Weight=0.000663oz, Width=3mm
U4: library part CMP-7264-000000-1, "General-purpose, dual-channel, 1/1 digital isolator 8-SOIC -40 to 125", Manufacturer_Name="Texas Instruments", Component Type=Standard, Copyright="Copyright (C) 2025 Ultra Librarian. All rights reserved.", Design Item ID=ISO6721BDR, Manufacturer_Part_Number=ISO6721BDR, Pin Count=8, RefDes=RefDes, Source=ISO6721BDR.SchLib, Type=Type

## Via types
v1: diameter 50, hole 28, Top Layer to Bottom Layer, 26 vias

## Nets (pads, with @x,y where several pads share a name; then routed paths per layer and width w, separated by ;. In a path a pad name is that pad's centre, name@x,y a point inside that pad or via, vN(x,y) a via of type N, cw(c..) or ccw(c..) an arc to the next point about the centre after c; other vN are vias at no path point)
+5: B1.1 C3.2 R1.2 R2.2 U1.3 U4.1 | length 3903.5
  Top Layer w24: U4.1 675,205 650,230 650,421.34 C3.2 730.47,438.2 730.47,434.34 745.39,419.41 775.18,419.41 814.59,380 v1(820,380)
  Top Layer w30: U1.3 B1.1 ; v1(1338.58,669.29) 1342.41,665.46 1379.81,665.46 R1.2 ; v1(1415.98,314.96) 1418.99,311.96 1497.1,311.96 R2.2 ; v1(1574.8,1614.17) 1574.8,1608.76 1614.17,1569.39 v1(1614.17,1259.84)
  Bottom Layer w30: v1(820,380) 830,370 830,170 960,40 1290,40 1350,100 1350,248.98 v1(1415.98,314.96) 1338.58,392.36 v1(1338.58,669.29) 1614.17,944.88 v1(1614.17,1259.84) ; B1.1 1574.8,1732.28 v1(1574.8,1614.17)
+12: J3.1 J11.2 J11.4 J22.1 | length 961.5
  Top Layer w24: J11.2 280.92,1418.26 225.46,1473.72 225.46,1562.79 J11.4@280.92,1618.26 ; J11.4 J11.4@280.92,1618.26 ; J3.1 J22.1 322.26,1936.44 225.46,1839.63 225.46,1673.72 J11.4@280.92,1618.26
"+Batter Input": J4.5 J5.1 J5.2 Q5.3 R5.2 R6.1 R18.2 | length 4453
  Top Layer w24: v1(1417.32,2165.35) 2310.56,2165.35 R5.2 2635.24,1906.53 2652,1889.76 2695.08,1889.76 2699.97,1884.88 2709.14,1884.88 2722.73,1871.29 2906.79,1871.29 J5.1 2987.89,1413.09 v1(2952.76,1377.95) ; Q5.3 2543.79,890.25 2598.43,944.88 2906.35,944.88 ; R18.2 2887.61,881.7 2887.61,926.14 2906.35,944.88 ; v1(2952.76,984.25) 2945.72,984.25 2906.35,944.88
  Bottom Layer w24: J4.5 403.64,2265.48 403.64,2194.78 433.07,2165.35 v1(1417.32,2165.35) ; v1(2952.76,984.25) v1(2952.76,1377.95)
GND: B1.2 C1.1 C2.1 C3.1 D5.2 D7.2 J4.3 J11.1 J11.3 J11.5 Q2.2 Q3.4 Q4.4 R7.1 R9.1 R12.1 R13.1 R14.2 R15.2 R16.2 R17.2 R21.1 R23.1 U1.2 U2.2 U3.3 U4.4 | length 208.3
  Top Layer w8: v1(82.77,2069.94) 90.15,2069.94 119.58,2040.51 119.58,2027.07 118.11,2025.61 U3.3
  Top Layer w10: Q2.2 706.79,1374.55 R9.1 ; R23.1@2480.32,78.74 2491.55,89.98 R23.1
NetB1_3: B1.3 C2.2 SW1.1 SW1.3 SW1.5 U3.8 | length 1846.1
  Top Layer w10: U3.8 118.11,2218.11 130,2230 180,2230 201.99,2208.01 C2.2 257.82,2210 v1(320,2210) ; 1338.58,1062.99 1377.95,1062.99 1456.69,984.25 1456.69,899.93 SW1.1 SW1.3 SW1.5
  Bottom Layer w10: v1(320,2210) 330,2210 419.06,2120.94 606.79,2120.94 cw(c606.79,2074.44) 616.07,2120 1020,2120 1022.93,2117.07 1270,1870 1270,1800 1290.87,1779.13 1327.95,1779.13 B1.3
NetB1_4: B1.4 U3.4 | length 1389.5
  Top Layer w8: U3.4 137.8,1978.48 140,1976.27 v1(140,1920)
  Bottom Layer w10: v1(140,1920) 330,1920 581.5,1668.5 B1.4
NetB1_5: B1.5 U3.2 | length 1536.6
  Top Layer w8: v1(80,1860) 80,1871.37 100,1891.37 100,1976.9 98.43,1978.48 U3.2
  Bottom Layer w10: v1(80,1860) 135.86,1804.14 340,1804.14 340,1800 571.5,1568.5 B1.5
NetB1_6: B1.6 R8.1 | length 987
  Top Layer w10: R8.1 535.12,1320.55 589.45,1320.55 630,1280 791.28,1280 831.84,1320.55 1005.59,1320.55 1153.54,1468.5 B1.6
NetB1_7: B1.7 C1.2 D5.1 R5.1 R7.2 | length 1541.2
  Top Layer w10: B1.7 1466.14,1496.06 v1(1535.43,1496.06) ; v1(1771.65,1692.91) 1895.02,1816.28 2199.47,1816.28 2233.5,1782.24 2295.25,1782.24 2308.15,1795.15 2308.15,1808.15 D5.1 2311.02,1816.93 2326.77,1832.68 R7.2 2424.73,1968.5 R5.1
  Bottom Layer w10: v1(1535.43,1496.06) 1574.8,1496.06 v1(1771.65,1692.91)
NetB1_8: B1.8 R19.2 | length 1102.1
  Top Layer w10: B1.8 1583.46,1023.62 v1(1692.91,1023.62) ; v1(2007.87,944.88) 2054.54,898.21 2054.54,678.56 R19.2
  Bottom Layer w10: v1(1692.91,1023.62) 1929.13,1023.62 v1(2007.87,944.88)
NetB1_9: B1.9 R17.1 U3.1 U3.5 | length 2334.3
  Top Layer w8: v1(50,1930) 58.04,1938.04 58.04,1966.58 78.74,1987.29 U3.1 76.59,2008.02 76.59,2009.57 65.28,2009.57 34.47,2040.38 34.47,2099.62 43.85,2109 103.93,2109 157.48,2055.45 U3.5 ; v1(1090,1170) 1231.34,1170 R17.1 1250.16,1168.5 B1.9
  Bottom Layer w8: v1(50,1930) 50,1885.74 41,1876.74 41,1409 280,1170 v1(1090,1170)
NetB1_10: B1.10 R14.1 SW1.6 | length 535.4
  Top Layer w10: SW1.6 1907.63,798.97 R14.1 1938.58,832.76 B1.10
NetB1_11: B1.11 R15.1 SW1.4 | length 501.8
  Top Layer w10: SW1.4 1765.76,848.97 1785.8,869.01 1786.94,869.01 1829.41,911.48 1829.41,920.75 R15.1 1850,1179.92 B1.11
NetB1_12: B1.12 R16.1 SW1.2 | length 584.8
  Top Layer w10: SW1.2 1765.76,898.97 1775.72,908.93 1775.72,951.99 1810.59,986.86 1810.59,1060.75 R16.1 1770,1199.92 B1.12
NetB1_13: B1.13 U2.3 | length 1995
  Top Layer w10: v1(1141.73,1023.62) 1141.1,1022.99 1101.73,1022.99 1062.99,984.25 1062.99,472.44 1141.73,393.7 1287.4,393.7 1296.34,402.64 1296.34,404.61 1299.21,407.48 U2.3 ; U2.3@1298.46,410.2 U2.3@1308.38,400.29
  Bottom Layer w10: v1(1141.73,1023.62) 1377.95,1023.62 1456.69,1102.36 1456.69,1299.21 1625.98,1468.5 B1.13
NetB1_14: B1.14 U2.1 | length 2273.5
  Top Layer w10: v1(1102.36,354.33) 1023.62,433.07 1023.62,984.25 v1(1141.73,1102.36) ; v1(1181.1,472.44) 1191.93,472.44 1205.71,458.66 U2.1
  Bottom Layer w10: v1(1102.36,354.33) 1154.96,354.33 1181.1,380.48 v1(1181.1,472.44) ; v1(1141.73,1102.36) 1181.1,1062.99 1377.95,1062.99 1436.69,1121.73 1436.69,1307.5 1617.7,1488.5 1803.46,1488.5 1889.76,1574.8 1932.28,1574.8 B1.14
NetB1_15: B1.15 R11.1 | length 691.3
  Top Layer w10: B1.15 2111.02,1668.5 2204.72,1574.8 2204.72,1311.93 R11.1
NetB1_16: B1.16 R10.1 | length 392.3
  Top Layer w10: B1.16 2198.15,1768.5 R10.1
NetD1_1: D1.1 D3.2 U2.5 | length 904.8
  Top Layer w10: U2.5 1438.21,458.66 1451.99,472.44 1556.95,472.44 D1.1@1571.35,486.84 ; D1.1 D1.1@1571.35,486.84 ; D3.2 2043.46,190 1950,190 1662.92,477.08 1581.12,477.08 D1.1@1571.35,486.84
NetD1_2: D1.2 D3.1 R1.1 | length 933.9
  Top Layer w10: R1.1 1535.62,592.33 1535.62,586.55 1560.61,561.57 1561.59,561.57 1571.35,551.8 D1.2 1571.35,549.83 1581.12,540.07 1639.93,540.07 1970,210 2123.46,210 D3.1
NetD2_1: D2.1 D4.2 U2.4 | length 668.5
  Top Layer w10: U2.4 1375.98,262.69 1465.81,172.86 D2.1 1785.01,172.86 D4.2
NetD2_2: D2.2 D4.1 R2.1 | length 495
  Top Layer w10: R2.1 1582.78,252.46 1581.12,250.8 1581.12,245.62 D2.2 1822.02,235.86 D4.1
NetD6_1: D6.1 Q6.3 | length 217.2
  Top Layer w10: D6.1 2324.8,549.21 2362.2,511.81 2362.2,457.81 2360.65,456.25 2360.65,447.39 2353.83,440.58 Q6.3
NetD6_3: D6.3 Q5.1 R18.1 | length 801.5
  Top Layer w24: D6.3 v1(2480.32,708.66) ; v1(2834.65,669.29) 2828.98,669.29 2724.9,773.38 Q5.1 2727.11,785.43 R18.1
  Bottom Layer w24: v1(2480.32,708.66) 2795.28,708.66 v1(2834.65,669.29)
NetD7_1: D7.1 Q6.1 R19.1 R21.2 | length 520.9
  Top Layer w10: D7.1 2105.45,301.18 2109.95,305.68 2109.95,310.46 2125.98,326.5 2125.98,481.43 R21.2 ; R19.1 2139.19,658.06 R21.2 ; Q6.1 2155.84,477.98 R21.2
NetJ1_3: J1.3 U4.5 | length 253.6
  Top Layer w10: J1.3 403.09,457.12 505.2,355 U4.5
NetJ1_5: J1.5 U4.6 | length 486.2
  Top Layer w10: J1.5 566.5,402.13 566.5,330.98 540.52,305 U4.6
NetJ1_6: J1.6 U4.8 | length 932.2
  Top Layer w10: J1.6 302.93,757.12 277.13,731.31 237.17,731.31 200,694.14 200,270 290,180 420,180 445,205 U4.8
NetJ1_9: J1.9 U4.7 | length 952.7
  Top Layer w10: J1.9 586.5,782.13 586.5,300.98 540.52,255 U4.7
NetJ3_2: J3.2 U1.1 | length 622.3
  Top Layer w24: J3.2 912.72,1768.5 U1.1
NetJ4_1: J4.1 Q1.5 Q1.6 Q1.7 Q1.8 | length 591.5
  Top Layer w24: 669.29,1732.28 669.29,1803.99 708.66,1843.36 v1(708.66,1850.39) ; v1(787.4,2007.87) 787.4,2014.91 805.52,2033.03 J4.1
  Bottom Layer w24: v1(708.66,1850.39) 787.4,1929.13 v1(787.4,2007.87)
NetJ4_2: J4.2 U3.6 | length 592.9
  Top Layer w10: U3.6 611.43,2167.36 705.52,2261.45 J4.2
NetJ4_4: J4.4 U3.10 | length 646.9
  Top Layer w10: U3.10 77.68,2167.36 40.31,2204.72 39.37,2204.72 39.37,2283.46 77.63,2321.72 466.14,2321.72 505.52,2282.35 J4.4
NetJ6_1: J6.1 J6.2 J7.1 | length 178.3
  Top Layer w24: J6.2 3166.68,2054.98 3337.66,2054.98 J7.1
NetJ8_1: J8.1 J9.1 J9.2 | length 282.1
  Top Layer w24: J8.1 3042.12,135.92 3217.12,135.92 J9.2 J9.1
NetJ10_1: J10.1 Q4.1 Q4.2 Q4.5 Q4.6 | length 2152.2
  Top Layer w10: Q4.5 2533.36,1110.93 2539.39,1116.95 2564.74,1116.95 2570.76,1110.93 Q4.6 ; Q4.2 Q4.1 2570.76,1181.72 2576.79,1175.7 2584.25,1175.7 2590.1,1169.84 2590.1,1121.73
  Top Layer w24: Q4.6 2589.47,1121.09 3248.99,1121.09 3582.68,787.4 3582.68,196.85 3519.24,133.42 J10.1
NetJ12_1: J12.1 U3.9 | length 3237.9
  Top Layer w8: U3.9 98.43,2139.96 128.39,2110 170,2110 190,2090 190,1869.23 100,1779.23 100,250 259.28,90.72 613.55,90.72 632.42,109.59 986.69,109.59 1005.56,90.72 1174.98,90.72 J12.1
NetJ12_2: J12.2 U4.2 | length 529.6
  Top Layer w10: U4.2 742.14,250 850,250 910.28,189.72 1173.98,189.72 J12.2
NetJ13_1: J13.1 U3.7 | length 2990.3
  Top Layer w8: U3.7@138.88,2167.36 138.88,2147.05 138.62,2146.79 138.62,2144.91 138.88,2144.65 138.88,2138.88 149.13,2128.62 181.38,2128.62 210,2100 210,1862.36 150,1802.36 150,250 263.78,136.22 J13.1
NetJ13_2: J13.2 U4.3 | length 393.7
  Top Layer w10: U4.3 953.74,305 1022.52,236.22 J13.2
NetJ22_2: J22.2 Q1.1 Q1.2 Q1.3 R3.2 | length 373.7
  Top Layer w10: R3.2 523.65,1706.72 Q1.3 587.1,1719.71
  Top Layer w24: 587.1,1719.71 Q1.2 Q1.1 587.1,1834.46 606.79,1854.15 J22.2
NetQ1_4: Q1.4 R3.1 R4.1 | length 357.1
  Top Layer w10: R3.1@472.55,1572.83 474.41,1574.69 551.29,1574.69 ; Q1.4 575.59,1680.74 572.61,1677.77 572.61,1596.24 551.18,1574.8 628.29,1497.69 669.29,1497.69
NetQ2_1: Q2.1 R8.2 R9.2 | length 274.5
  Top Layer w10: R8.2 568.65,1340.55 631.79,1403.69 668.66,1366.82 R9.2
NetQ2_3: Q2.3 R4.2
NetQ3_1: Q3.1 Q3.2 Q3.5 Q3.6 R6.2 | length 331.7
  Top Layer w10: Q3.5 Q3.6 Q3.1 ; Q3.2 Q3.1 ; R6.2 2615.98,1669.12 Q3.1
NetQ3_3: Q3.3 R10.2 R12.2 | length 273.5
  Top Layer w10: R12.2 R10.2 2515.45,1674.64 Q3.3
NetQ4_3: Q4.3 R11.2 R13.2 | length 299.7
  Top Layer w10: R13.2 2322.83,1130.45 2322.83,1141.73 2362.2,1181.1 2362.2,1212.14 R11.2
  Top Layer w24: R11.2 2468.2,1224.64 2481.78,1211.06 2494.98,1211.06 2495.96,1210.08 Q4.3
NetQ5_2: Q5.2 Q5.4 R20.2 | length 522.6
  Top Layer w24: Q5.2 Q5.4 2669.78,535.19 2769.11,435.86 R20.2
NetQ6_2: Q6.2 R22.1 R23.2 | length 430.4
  Top Layer w24: Q6.2 2254.42,344 2283.46,314.96 2472.41,314.96 R22.1 R23.2
NetR20_1: R20.1 R22.2 | length 212
  Top Layer w24: R22.2 2645.09,378.49 R20.1
pads on no net: B1.17 B1.18 D6.2 D7.3 J1.1 J1.2 J1.4 J1.7 J1.8 J2.1 J2.2 J2.3 J2.4 J2.5 J2.6 J2.7 J2.8 J2.9 J7.2 J8.2 J10.2
copper on no net: | length 157.5
  Top Layer w10: 706.79,1410.69 767.84,1410.69 836.04,1478.89

## Polygon pours and split planes (outlines as drawn)
GND on Bottom Layer "GND_L02_P008" (solid, shelved, pour order 8): 3937.01,2362.2 3937.01,0 0,0 0,2362.2
NetJ10_1 on Top Layer "NETJ10" (solid, pour order 6): 2520,1260 2650,1260 2650,1040 2520,1040
GND on Top Layer "GND_L01_P007" (solid, shelved, pour order 7): 0,2362.2 3937.01,2362.2 3937.01,0 0,0

## Silkscreen, mask and mechanical layers (free items; w line width, h text height)
Top Overlay:
  text "Space Battery Test V1" at 1305.76,2242.23 h60
Top Solder:
  text "Mode:" at 1195.76,991.76 h43.31
  text "I" at 1205.76,923.02 h43.31
  text "II" at 1205.76,844.28 h43.31
  text "III" at 1205.76,765.54 h43.31
Mechanical 1:
  region: 1246.55,844.12 1266.24,863.81
  lines w10: 5,5 5,2362.2 3937.01,2362.2 3937.01,5 5,5

## Text inside footprints (layer, text, board x,y; h text height)
J3: Top Assembly "1" at 431.98,2054.75 h39.37
J5: Top Assembly "1" at 3007.57,1877.59 h39.37 r90
J6: Top Assembly "1" at 3183.77,1877.59 h39.37 r90
J7: Top Assembly "1" at 3320.57,2132.38 h39.37 r270
J8: Top Assembly "1" at 3059.31,58.61 h39.37 r90
J9: Top Assembly "1" at 3199.94,313.22 h39.37 r270
J10: Top Assembly "1" at 3409.31,58.61 h39.37 r90
J12: Top Assembly "1" at 1240.16,61.42 h39.37 r90
J13: Top Assembly "1" at 1122.05,61.42 h39.37 r90
J22: Top Assembly "1" at 431.98,1916.75 h39.37
U4: Top Overlay "*" at 759.64,188.03 h50 r180; Mechanical 13 "*" at 706,234.5 h50 r180